# Altium PCB adau1979-fpga.PcbDoc (part 2 of 10)
Units mil, origin at the board's own origin, x right, y up, seen from the top; angles counter-clockwise.
Board outline 7874.02 x 9055.12 mil, 4 copper layers (Top Layer, GND, POWER, Bottom Layer), stack 23.756 mil thick; 636 components, 457 nets, 2015 pads, 4184 vias.
Unrouted connection lines stored in the file: 10.
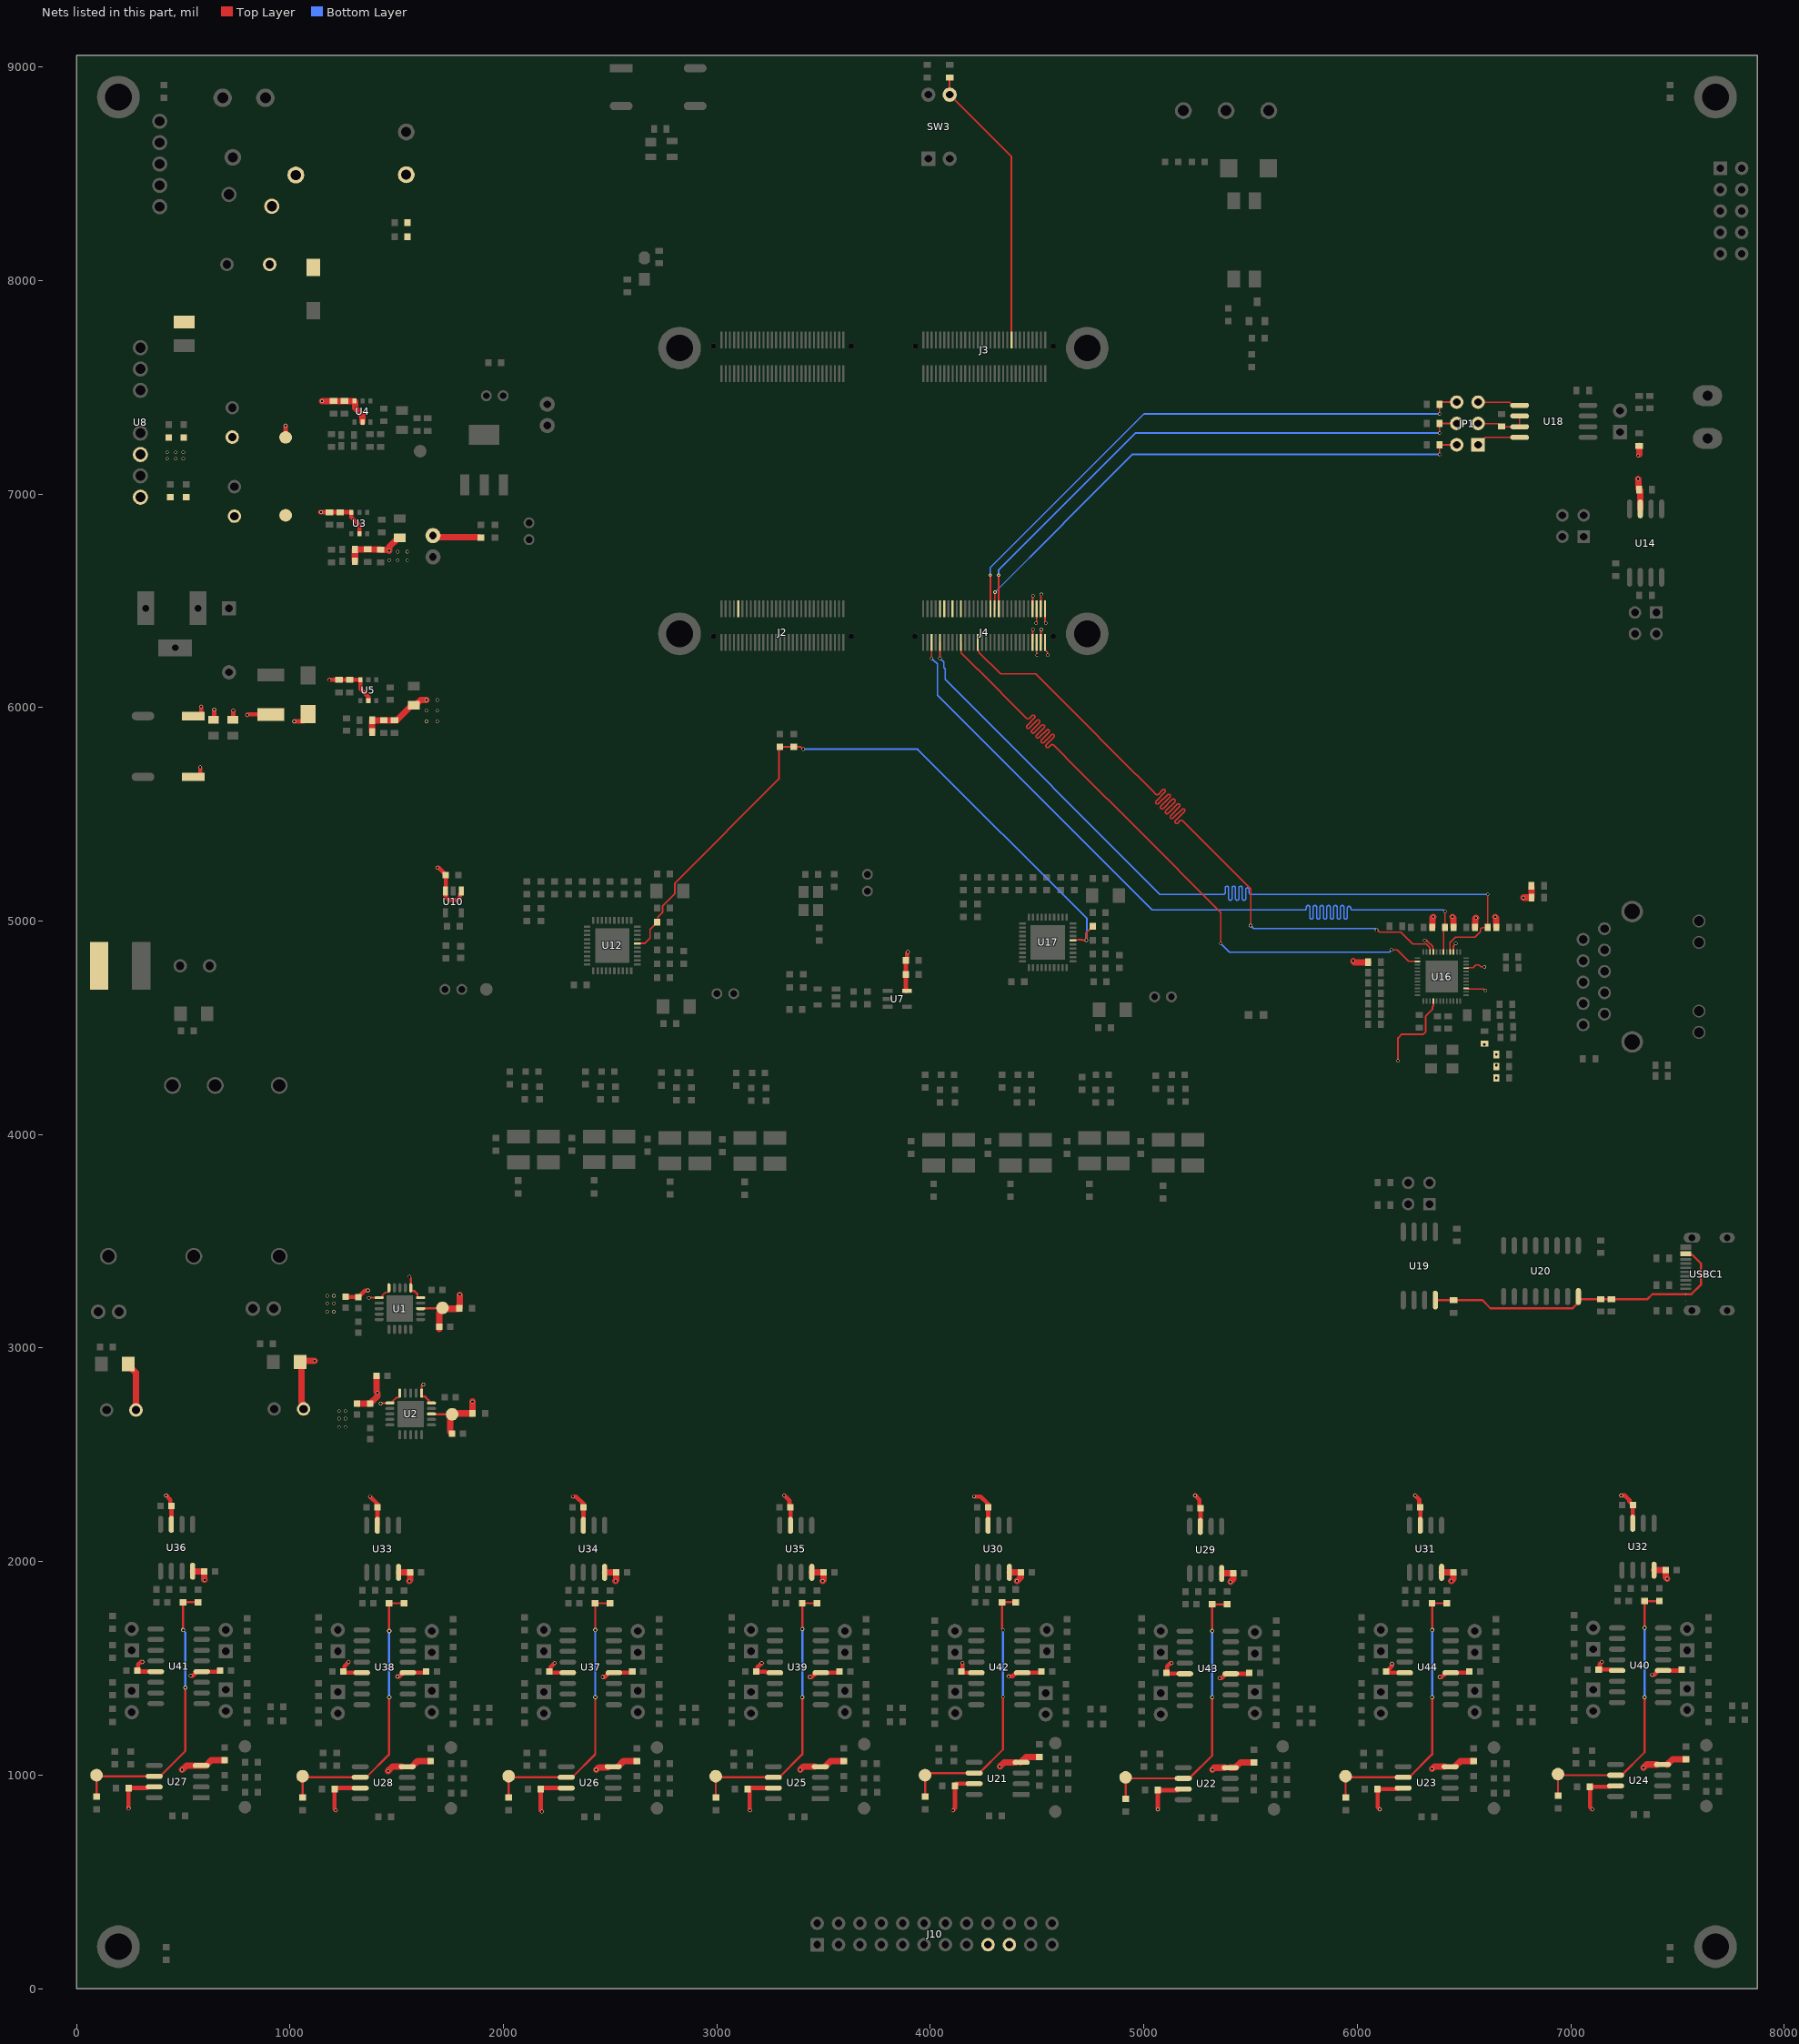
[diagram p4: the nets of this part, all layers, seen from the top]

## Footprints (in the part's own frame and the unit in brackets; to place one, negate y for a bottom-side part, rotate by r counter-clockwise, add the part's x,y. Pads: shape width x height; smd on the part's side, far side on the other; paste and mask are expansions set on the pad) (continued)
SOP-16 [mil] "淘宝ID:黄晶宝石"
  oval 80x24 smd: 1(0,0) 2(0,-50) 3(0,-100) 4(0,-150) 5(0,-200) 6(0,-250) 7(0,-300) 8(0,-350) 9(238.5,-350) 10(238.5,-300) 11(238.5,-250) 12(238.5,-200) 13(238.5,-150) 14(238.5,-100) 15(238.5,-50) 16(238.5,0)
  silkscreen extent 44,-375 194,25
SOT-23-5_L2.9-W1.6-P0.95-LS2.8-BL [mm]
  rect 0.6x1 smd paste+0 mask+0.05: 1(-0.95,-1.1) 2(0,-1.1) 3(0.95,-1.1) 4(0.95,1.1) 5(-0.95,1.1)
  silkscreen extent -1.52,-0.7 1.4,0.89
SOT-23-5_L3.0-W1.7-P0.95-LS2.8-BL [mm]
  rect 0.49x1.157 smd: 1(-0.95,-1.154) 2(0,-1.154) 3(0.95,-1.154)
  rect 0.49x1.175 smd: 4(0.95,1.154) 5(-0.95,1.154)
  silkscreen extent -1.8,-1.29 1.53,0.85
SOT-23-5_L3.0-W1.7-P0.95-LS2.8-BR [mil]
  rect 43.3x23.6 smd: 1(51.2,-37.4) 2(51.2,0) 3(51.2,37.4) 4(-51.1,37.4) 5(-51.1,-37.4)
  silkscreen extent -35,-61 36,61
SOT-23-6 [mm] "淘宝ID:黄晶宝石"
  rect 0.6x0.5 smd: 1(0,0) 2(0,-0.95) 3(0,-1.9) 4(2.5,-1.9) 5(2.5,-0.95) 6(2.5,0)
  silkscreen extent 0.63,-2.38 1.87,0.48
SOT-23_L2.9-W1.3-P1.90-LS2.4-BR [mm]
  rect 1x0.8 smd: 1(1.15,-0.95) 2(1.15,0.95) 3(-1.15,0)
  silkscreen extent -0.7,-1.5 0.7,1.5
SOT-143 [mil]
  rect 40x50 smd: 1(-32.5,-50)
  rect 30x50 smd: 2(37.5,-50) 3(37.5,50) 4(-37.5,50)
SOT-223-3_L6.5-W3.4-P2.30-LS7.0-BR [mm]
  rect 2.5x1.1 smd: 1(2.97,-2.3) 2(2.97,0) 3(2.97,2.3)
  rect 2.34x3.6 smd: 4(-2.97,0)
  silkscreen extent -1.57,-3.33 1.37,3.33
SW-TH_2MS1T2B2VS2QES [mm]
  round 1.8 hole 1.15: 1(0,-2.54) 2(0,0) 3(0,2.54) 4(0,5.08) 5(0,-5.08)
  silkscreen extent -2.54,-5.08 2.54,5.08
TEST [mm]
  round 1.5 smd: 1(0,0)
"TSW SMD-6*6*4.3" [mm] "6*6*4.3mm"
  rect 2.7x1 smd: 1(-4.4,2.261)
  oval 2.7x1 smd: 2(-4.4,-2.239) 3(4.4,-2.239) 4(4.4,2.261)
  silkscreen extent -2.79,-2.79 2.79,2.79, body extent -4.5,-3 4.5,3, height 4.25
USB-C_SMD-TYPE-C-31-M-12_1 [mm]
  oval 1.2x2 hole 0.8 slot 1.6 at 90 deg: 1(5.513,2.736) 4(-3.137,2.736)
  oval 1.2x1.8 hole 0.8 slot 1.4 at 90 deg: 2(5.513,-1.444) 3(-3.137,-1.444)
  round 0.12 smd: A1B12(-2.012,3.504) A4B9(-1.212,3.504)
  rect 0.3x1.3 smd paste-100 mask+0.051: A5(-0.062,3.504) A6(0.938,3.504) A7(1.438,3.504) A8(2.438,3.504) B5(2.938,3.504) B6(1.938,3.504) B7(0.438,3.504) B8(-0.562,3.504)
  rect 0.6x1.3 smd paste-100 mask+0.051: B1A12(4.388,3.504) B4A9(3.588,3.504)
  Top Layer region: -1.712,2.854 -2.012,2.854 -2.312,2.854 -2.312,4.154 -2.012,4.154 -1.712,4.154
  Top Layer region: -0.912,2.854 -1.212,2.854 -1.512,2.854 -1.512,4.154 -1.212,4.154 -0.912,4.154
  Keep-Out Layer board cut-out: 4.463,2.161 4.406,2.023 4.3,1.918 4.162,1.861 4.013,1.861 3.875,1.918 3.77,2.023 3.713,2.161 3.713,2.31 3.77,2.448 3.875,2.554 4.013,2.611 4.162,2.611 4.3,2.554 4.406,2.448 4.463,2.31
  Keep-Out Layer board cut-out: -1.337,2.161 -1.394,2.023 -1.5,1.918 -1.637,1.861 -1.787,1.861 -1.924,1.918 -2.03,2.023 -2.087,2.161 -2.087,2.31 -2.03,2.448 -1.924,2.554 -1.787,2.611 -1.637,2.611 -1.5,2.554 -1.394,2.448 -1.337,2.31
  Keep-Out Layer circle w0.025: c4.088,2.236 r0.375
  Keep-Out Layer circle w0.025: c-1.712,2.236 r0.375
  Keep-Out Layer region: 4.463,2.161 4.406,2.023 4.3,1.918 4.162,1.861 4.013,1.861 3.875,1.918 3.77,2.023 3.713,2.161 3.713,2.31 3.77,2.448 3.875,2.554 4.013,2.611 4.162,2.611 4.3,2.554 4.406,2.448 4.463,2.31
  Keep-Out Layer region: -1.337,2.161 -1.394,2.023 -1.5,1.918 -1.637,1.861 -1.787,1.861 -1.924,1.918 -2.03,2.023 -2.087,2.161 -2.087,2.31 -2.03,2.448 -1.924,2.554 -1.787,2.611 -1.637,2.611 -1.5,2.554 -1.394,2.448 -1.337,2.31
  silkscreen extent -3.28,-4.06 5.66,1.52

## Part data
1 2 3 4 5 6 7 8 9 10 11 12 13 14 15 16 17 18 19 20 21 22 23 24 +1 +2 -1 -2 -3 T1: library part TEST-POINT, "测试点"
C1 C2 C3 C4 C5 C6 C7 C8 C9 C10 C11 C12 C13 C16 C17 C18 C19 C20 C21 C22 C23 C24 C25 C26 C27 C28 C29 C75 C77 C84 C85 C86 C89 C91 C92 C93 C94 C102 C103 C104 C105 C106 C110 C111 C113 C116 C118 C127 C128 C129 C130 C132 C133 C140 C141 C142 C143 C144 C145 C146 C147 C148 C149 C150 C151 C152 C153 C154 C155 C156 C157 C158 C159 C160 C161 C162 C163 C164 C165 C166 C167 C168 C169 C170 C171 C172 C173 C174 C175 C176 C177 C178 C179 C180 C181 C182 C183 C184 C185 C186 C187 C188 C189 C190 C191 C192 C193 C194 C195 C196 C197 C198 C199 C200 C201 C202 C203 C204 C205 C206 C207 C208 C209 C210 C211: library part C, "贴片电容", BOM名称=无极性贴片电容, 唯一出售店铺网址=https://shop463601444.taobao.com, 淘宝ID="封装库来自淘宝 ID：黄晶宝石", 联系售后，技术支持=https://shop463601444.taobao.com
  C1 C2 C3 C4 C5 C6 C7: AddInBom=yes, DesignItemID=C, Device=C, FootprintName="C 0603_L", LibraryName="0.1 - 电阻-电容-电感", Origin Footprint="C 0201_L", OriginFootprint 2="C 0402_L", OriginFootprint 3="C 0805_L", OriginFootprint 4="C 1206_L", OriginFootprint 5="C 1210_L", OriginFootprint 6="C 1808_L", OriginFootprint 7="C 1812_L", OriginFootprint 8="C 1825_L", OriginFootprint 9="C 2225_L", OriginFootprint 10="C 0201_M", OriginFootprint 11="C 0402_M", OriginFootprint 12="C 0603_M", OriginFootprint 13="C 0805_M", OriginFootprint 14="C 1206_M", OriginFootprint 15="C 1210_M", OriginFootprint 16="C 1808_M", OriginFootprint 17="C 1812_M", OriginFootprint 18="C 1825_M", OriginFootprint 19="C 2225_M", OriginModelName="C 0603", Symbol=C
  C172: AddInBom=yes, DesignItemID=C, Device=C, FootprintName="C 0603_L", LibraryName="0.1 - 电阻-电容-电感", Origin Footprint="C 0201_L", OriginFootprint 2="C 0402_L", OriginFootprint 3="C 0805_L", OriginFootprint 4="C 1206_L", OriginFootprint 5="C 1210_L", OriginFootprint 6="C 1808_L", OriginFootprint 7="C 1812_L", OriginFootprint 8="C 1825_L", OriginFootprint 9="C 2225_L", OriginFootprint 10="C 0201_M", OriginFootprint 11="C 0402_M", OriginFootprint 12="C 0603_M", OriginFootprint 13="C 0805_M", OriginFootprint 14="C 1206_M", OriginFootprint 15="C 1210_M", OriginFootprint 16="C 1808_M", OriginFootprint 17="C 1812_M", OriginFootprint 18="C 1825_M", OriginFootprint 19="C 2225_M", OriginModelName="C 0603", SymbolName=C, UniqueId=2b2365c2d0e3ae99
  C173: AddInBom=yes, DesignItemID=C, Device=C, FootprintName="C 0603_L", LibraryName="0.1 - 电阻-电容-电感", Origin Footprint="C 0201_L", OriginFootprint 2="C 0402_L", OriginFootprint 3="C 0805_L", OriginFootprint 4="C 1206_L", OriginFootprint 5="C 1210_L", OriginFootprint 6="C 1808_L", OriginFootprint 7="C 1812_L", OriginFootprint 8="C 1825_L", OriginFootprint 9="C 2225_L", OriginFootprint 10="C 0201_M", OriginFootprint 11="C 0402_M", OriginFootprint 12="C 0603_M", OriginFootprint 13="C 0805_M", OriginFootprint 14="C 1206_M", OriginFootprint 15="C 1210_M", OriginFootprint 16="C 1808_M", OriginFootprint 17="C 1812_M", OriginFootprint 18="C 1825_M", OriginFootprint 19="C 2225_M", OriginModelName="C 0603", SymbolName=C, UniqueId=2ac4a713bdb27458
  C174: AddInBom=yes, DesignItemID=C, Device=C, FootprintName="C 0603_L", LibraryName="0.1 - 电阻-电容-电感", Origin Footprint="C 0201_L", OriginFootprint 2="C 0402_L", OriginFootprint 3="C 0805_L", OriginFootprint 4="C 1206_L", OriginFootprint 5="C 1210_L", OriginFootprint 6="C 1808_L", OriginFootprint 7="C 1812_L", OriginFootprint 8="C 1825_L", OriginFootprint 9="C 2225_L", OriginFootprint 10="C 0201_M", OriginFootprint 11="C 0402_M", OriginFootprint 12="C 0603_M", OriginFootprint 13="C 0805_M", OriginFootprint 14="C 1206_M", OriginFootprint 15="C 1210_M", OriginFootprint 16="C 1808_M", OriginFootprint 17="C 1812_M", OriginFootprint 18="C 1825_M", OriginFootprint 19="C 2225_M", OriginModelName="C 0603", SymbolName=C, UniqueId=043006a40a259ae3
  C175: AddInBom=yes, DesignItemID=C, Device=C, FootprintName="C 0603_L", LibraryName="0.1 - 电阻-电容-电感", Origin Footprint="C 0201_L", OriginFootprint 2="C 0402_L", OriginFootprint 3="C 0805_L", OriginFootprint 4="C 1206_L", OriginFootprint 5="C 1210_L", OriginFootprint 6="C 1808_L", OriginFootprint 7="C 1812_L", OriginFootprint 8="C 1825_L", OriginFootprint 9="C 2225_L", OriginFootprint 10="C 0201_M", OriginFootprint 11="C 0402_M", OriginFootprint 12="C 0603_M", OriginFootprint 13="C 0805_M", OriginFootprint 14="C 1206_M", OriginFootprint 15="C 1210_M", OriginFootprint 16="C 1808_M", OriginFootprint 17="C 1812_M", OriginFootprint 18="C 1825_M", OriginFootprint 19="C 2225_M", OriginModelName="C 0603", SymbolName=C, UniqueId=ed052c5890e059ff
  C176: AddInBom=yes, DesignItemID=C, Device=C, FootprintName="C 0603_L", LibraryName="0.1 - 电阻-电容-电感", Origin Footprint="C 0201_L", OriginFootprint 2="C 0402_L", OriginFootprint 3="C 0805_L", OriginFootprint 4="C 1206_L", OriginFootprint 5="C 1210_L", OriginFootprint 6="C 1808_L", OriginFootprint 7="C 1812_L", OriginFootprint 8="C 1825_L", OriginFootprint 9="C 2225_L", OriginFootprint 10="C 0201_M", OriginFootprint 11="C 0402_M", OriginFootprint 12="C 0603_M", OriginFootprint 13="C 0805_M", OriginFootprint 14="C 1206_M", OriginFootprint 15="C 1210_M", OriginFootprint 16="C 1808_M", OriginFootprint 17="C 1812_M", OriginFootprint 18="C 1825_M", OriginFootprint 19="C 2225_M", OriginModelName="C 0603", SymbolName=C, UniqueId=e3aeb17489c0ab5d
  C177: AddInBom=yes, DesignItemID=C, Device=C, FootprintName="C 0603_L", LibraryName="0.1 - 电阻-电容-电感", Origin Footprint="C 0201_L", OriginFootprint 2="C 0402_L", OriginFootprint 3="C 0805_L", OriginFootprint 4="C 1206_L", OriginFootprint 5="C 1210_L", OriginFootprint 6="C 1808_L", OriginFootprint 7="C 1812_L", OriginFootprint 8="C 1825_L", OriginFootprint 9="C 2225_L", OriginFootprint 10="C 0201_M", OriginFootprint 11="C 0402_M", OriginFootprint 12="C 0603_M", OriginFootprint 13="C 0805_M", OriginFootprint 14="C 1206_M", OriginFootprint 15="C 1210_M", OriginFootprint 16="C 1808_M", OriginFootprint 17="C 1812_M", OriginFootprint 18="C 1825_M", OriginFootprint 19="C 2225_M", OriginModelName="C 0603", SymbolName=C, UniqueId=cc1d00c51cc12124
  C178: AddInBom=yes, DesignItemID=C, Device=C, FootprintName="C 0603_L", LibraryName="0.1 - 电阻-电容-电感", Origin Footprint="C 0201_L", OriginFootprint 2="C 0402_L", OriginFootprint 3="C 0805_L", OriginFootprint 4="C 1206_L", OriginFootprint 5="C 1210_L", OriginFootprint 6="C 1808_L", OriginFootprint 7="C 1812_L", OriginFootprint 8="C 1825_L", OriginFootprint 9="C 2225_L", OriginFootprint 10="C 0201_M", OriginFootprint 11="C 0402_M", OriginFootprint 12="C 0603_M", OriginFootprint 13="C 0805_M", OriginFootprint 14="C 1206_M", OriginFootprint 15="C 1210_M", OriginFootprint 16="C 1808_M", OriginFootprint 17="C 1812_M", OriginFootprint 18="C 1825_M", OriginFootprint 19="C 2225_M", OriginModelName="C 0603", SymbolName=C, UniqueId=d2625f4b4bd439ef
  C179: AddInBom=yes, DesignItemID=C, Device=C, FootprintName="C 0603_L", LibraryName="0.1 - 电阻-电容-电感", Origin Footprint="C 0201_L", OriginFootprint 2="C 0402_L", OriginFootprint 3="C 0805_L", OriginFootprint 4="C 1206_L", OriginFootprint 5="C 1210_L", OriginFootprint 6="C 1808_L", OriginFootprint 7="C 1812_L", OriginFootprint 8="C 1825_L", OriginFootprint 9="C 2225_L", OriginFootprint 10="C 0201_M", OriginFootprint 11="C 0402_M", OriginFootprint 12="C 0603_M", OriginFootprint 13="C 0805_M", OriginFootprint 14="C 1206_M", OriginFootprint 15="C 1210_M", OriginFootprint 16="C 1808_M", OriginFootprint 17="C 1812_M", OriginFootprint 18="C 1825_M", OriginFootprint 19="C 2225_M", OriginModelName="C 0603", SymbolName=C, UniqueId=a26eb100929f0697
  C180: AddInBom=yes, DesignItemID=C, Device=C, FootprintName="C 0603_L", LibraryName="0.1 - 电阻-电容-电感", Origin Footprint="C 0201_L", OriginFootprint 2="C 0402_L", OriginFootprint 3="C 0805_L", OriginFootprint 4="C 1206_L", OriginFootprint 5="C 1210_L", OriginFootprint 6="C 1808_L", OriginFootprint 7="C 1812_L", OriginFootprint 8="C 1825_L", OriginFootprint 9="C 2225_L", OriginFootprint 10="C 0201_M", OriginFootprint 11="C 0402_M", OriginFootprint 12="C 0603_M", OriginFootprint 13="C 0805_M", OriginFootprint 14="C 1206_M", OriginFootprint 15="C 1210_M", OriginFootprint 16="C 1808_M", OriginFootprint 17="C 1812_M", OriginFootprint 18="C 1825_M", OriginFootprint 19="C 2225_M", OriginModelName="C 0603", SymbolName=C, UniqueId=6158349470ed1956
  C181: AddInBom=yes, DesignItemID=C, Device=C, FootprintName="C 0603_L", LibraryName="0.1 - 电阻-电容-电感", Origin Footprint="C 0201_L", OriginFootprint 2="C 0402_L", OriginFootprint 3="C 0805_L", OriginFootprint 4="C 1206_L", OriginFootprint 5="C 1210_L", OriginFootprint 6="C 1808_L", OriginFootprint 7="C 1812_L", OriginFootprint 8="C 1825_L", OriginFootprint 9="C 2225_L", OriginFootprint 10="C 0201_M", OriginFootprint 11="C 0402_M", OriginFootprint 12="C 0603_M", OriginFootprint 13="C 0805_M", OriginFootprint 14="C 1206_M", OriginFootprint 15="C 1210_M", OriginFootprint 16="C 1808_M", OriginFootprint 17="C 1812_M", OriginFootprint 18="C 1825_M", OriginFootprint 19="C 2225_M", OriginModelName="C 0603", SymbolName=C, UniqueId=de488198406d19e5
  C182: AddInBom=yes, DesignItemID=C, Device=C, FootprintName="C 0603_L", LibraryName="0.1 - 电阻-电容-电感", Origin Footprint="C 0201_L", OriginFootprint 2="C 0402_L", OriginFootprint 3="C 0805_L", OriginFootprint 4="C 1206_L", OriginFootprint 5="C 1210_L", OriginFootprint 6="C 1808_L", OriginFootprint 7="C 1812_L", OriginFootprint 8="C 1825_L", OriginFootprint 9="C 2225_L", OriginFootprint 10="C 0201_M", OriginFootprint 11="C 0402_M", OriginFootprint 12="C 0603_M", OriginFootprint 13="C 0805_M", OriginFootprint 14="C 1206_M", OriginFootprint 15="C 1210_M", OriginFootprint 16="C 1808_M", OriginFootprint 17="C 1812_M", OriginFootprint 18="C 1825_M", OriginFootprint 19="C 2225_M", OriginModelName="C 0603", SymbolName=C, UniqueId=ac7cf9eb5671d2c3
  C183: AddInBom=yes, DesignItemID=C, Device=C, FootprintName="C 0603_L", LibraryName="0.1 - 电阻-电容-电感", Origin Footprint="C 0201_L", OriginFootprint 2="C 0402_L", OriginFootprint 3="C 0805_L", OriginFootprint 4="C 1206_L", OriginFootprint 5="C 1210_L", OriginFootprint 6="C 1808_L", OriginFootprint 7="C 1812_L", OriginFootprint 8="C 1825_L", OriginFootprint 9="C 2225_L", OriginFootprint 10="C 0201_M", OriginFootprint 11="C 0402_M", OriginFootprint 12="C 0603_M", OriginFootprint 13="C 0805_M", OriginFootprint 14="C 1206_M", OriginFootprint 15="C 1210_M", OriginFootprint 16="C 1808_M", OriginFootprint 17="C 1812_M", OriginFootprint 18="C 1825_M", OriginFootprint 19="C 2225_M", OriginModelName="C 0603", SymbolName=C, UniqueId=5471cb5e6ead650e
  C184: AddInBom=yes, DesignItemID=C, Device=C, FootprintName="C 0603_L", LibraryName="0.1 - 电阻-电容-电感", Origin Footprint="C 0201_L", OriginFootprint 2="C 0402_L", OriginFootprint 3="C 0805_L", OriginFootprint 4="C 1206_L", OriginFootprint 5="C 1210_L", OriginFootprint 6="C 1808_L", OriginFootprint 7="C 1812_L", OriginFootprint 8="C 1825_L", OriginFootprint 9="C 2225_L", OriginFootprint 10="C 0201_M", OriginFootprint 11="C 0402_M", OriginFootprint 12="C 0603_M", OriginFootprint 13="C 0805_M", OriginFootprint 14="C 1206_M", OriginFootprint 15="C 1210_M", OriginFootprint 16="C 1808_M", OriginFootprint 17="C 1812_M", OriginFootprint 18="C 1825_M", OriginFootprint 19="C 2225_M", OriginModelName="C 0603", SymbolName=C, UniqueId=909660952e1a96fd
  C185: AddInBom=yes, DesignItemID=C, Device=C, FootprintName="C 0603_L", LibraryName="0.1 - 电阻-电容-电感", Origin Footprint="C 0201_L", OriginFootprint 2="C 0402_L", OriginFootprint 3="C 0805_L", OriginFootprint 4="C 1206_L", OriginFootprint 5="C 1210_L", OriginFootprint 6="C 1808_L", OriginFootprint 7="C 1812_L", OriginFootprint 8="C 1825_L", OriginFootprint 9="C 2225_L", OriginFootprint 10="C 0201_M", OriginFootprint 11="C 0402_M", OriginFootprint 12="C 0603_M", OriginFootprint 13="C 0805_M", OriginFootprint 14="C 1206_M", OriginFootprint 15="C 1210_M", OriginFootprint 16="C 1808_M", OriginFootprint 17="C 1812_M", OriginFootprint 18="C 1825_M", OriginFootprint 19="C 2225_M", OriginModelName="C 0603", SymbolName=C, UniqueId=7abe426619a81940
  C186: AddInBom=yes, DesignItemID=C, Device=C, FootprintName="C 0603_L", LibraryName="0.1 - 电阻-电容-电感", Origin Footprint="C 0201_L", OriginFootprint 2="C 0402_L", OriginFootprint 3="C 0805_L", OriginFootprint 4="C 1206_L", OriginFootprint 5="C 1210_L", OriginFootprint 6="C 1808_L", OriginFootprint 7="C 1812_L", OriginFootprint 8="C 1825_L", OriginFootprint 9="C 2225_L", OriginFootprint 10="C 0201_M", OriginFootprint 11="C 0402_M", OriginFootprint 12="C 0603_M", OriginFootprint 13="C 0805_M", OriginFootprint 14="C 1206_M", OriginFootprint 15="C 1210_M", OriginFootprint 16="C 1808_M", OriginFootprint 17="C 1812_M", OriginFootprint 18="C 1825_M", OriginFootprint 19="C 2225_M", OriginModelName="C 0603", SymbolName=C, UniqueId=f9bfd7a6531d354d
  C187: AddInBom=yes, DesignItemID=C, Device=C, FootprintName="C 0603_L", LibraryName="0.1 - 电阻-电容-电感", Origin Footprint="C 0201_L", OriginFootprint 2="C 0402_L", OriginFootprint 3="C 0805_L", OriginFootprint 4="C 1206_L", OriginFootprint 5="C 1210_L", OriginFootprint 6="C 1808_L", OriginFootprint 7="C 1812_L", OriginFootprint 8="C 1825_L", OriginFootprint 9="C 2225_L", OriginFootprint 10="C 0201_M", OriginFootprint 11="C 0402_M", OriginFootprint 12="C 0603_M", OriginFootprint 13="C 0805_M", OriginFootprint 14="C 1206_M", OriginFootprint 15="C 1210_M", OriginFootprint 16="C 1808_M", OriginFootprint 17="C 1812_M", OriginFootprint 18="C 1825_M", OriginFootprint 19="C 2225_M", OriginModelName="C 0603", SymbolName=C, UniqueId=ecf0d2211b923647
  C188: AddInBom=yes, DesignItemID=C, Device=C, FootprintName="C 0603_L", LibraryName="0.1 - 电阻-电容-电感", Origin Footprint="C 0201_L", OriginFootprint 2="C 0402_L", OriginFootprint 3="C 0805_L", OriginFootprint 4="C 1206_L", OriginFootprint 5="C 1210_L", OriginFootprint 6="C 1808_L", OriginFootprint 7="C 1812_L", OriginFootprint 8="C 1825_L", OriginFootprint 9="C 2225_L", OriginFootprint 10="C 0201_M", OriginFootprint 11="C 0402_M", OriginFootprint 12="C 0603_M", OriginFootprint 13="C 0805_M", OriginFootprint 14="C 1206_M", OriginFootprint 15="C 1210_M", OriginFootprint 16="C 1808_M", OriginFootprint 17="C 1812_M", OriginFootprint 18="C 1825_M", OriginFootprint 19="C 2225_M", OriginModelName="C 0603", SymbolName=C, UniqueId=a2ee6ceb65d30336
  C189: AddInBom=yes, DesignItemID=C, Device=C, FootprintName="C 0603_L", LibraryName="0.1 - 电阻-电容-电感", Origin Footprint="C 0201_L", OriginFootprint 2="C 0402_L", OriginFootprint 3="C 0805_L", OriginFootprint 4="C 1206_L", OriginFootprint 5="C 1210_L", OriginFootprint 6="C 1808_L", OriginFootprint 7="C 1812_L", OriginFootprint 8="C 1825_L", OriginFootprint 9="C 2225_L", OriginFootprint 10="C 0201_M", OriginFootprint 11="C 0402_M", OriginFootprint 12="C 0603_M", OriginFootprint 13="C 0805_M", OriginFootprint 14="C 1206_M", OriginFootprint 15="C 1210_M", OriginFootprint 16="C 1808_M", OriginFootprint 17="C 1812_M", OriginFootprint 18="C 1825_M", OriginFootprint 19="C 2225_M", OriginModelName="C 0603", SymbolName=C, UniqueId=ff078052695da6b6
  C190: AddInBom=yes, DesignItemID=C, Device=C, FootprintName="C 0603_L", LibraryName="0.1 - 电阻-电容-电感", Origin Footprint="C 0201_L", OriginFootprint 2="C 0402_L", OriginFootprint 3="C 0805_L", OriginFootprint 4="C 1206_L", OriginFootprint 5="C 1210_L", OriginFootprint 6="C 1808_L", OriginFootprint 7="C 1812_L", OriginFootprint 8="C 1825_L", OriginFootprint 9="C 2225_L", OriginFootprint 10="C 0201_M", OriginFootprint 11="C 0402_M", OriginFootprint 12="C 0603_M", OriginFootprint 13="C 0805_M", OriginFootprint 14="C 1206_M", OriginFootprint 15="C 1210_M", OriginFootprint 16="C 1808_M", OriginFootprint 17="C 1812_M", OriginFootprint 18="C 1825_M", OriginFootprint 19="C 2225_M", OriginModelName="C 0603", SymbolName=C, UniqueId=553def7d7947fca6
  C191: AddInBom=yes, DesignItemID=C, Device=C, FootprintName="C 0603_L", LibraryName="0.1 - 电阻-电容-电感", Origin Footprint="C 0201_L", OriginFootprint 2="C 0402_L", OriginFootprint 3="C 0805_L", OriginFootprint 4="C 1206_L", OriginFootprint 5="C 1210_L", OriginFootprint 6="C 1808_L", OriginFootprint 7="C 1812_L", OriginFootprint 8="C 1825_L", OriginFootprint 9="C 2225_L", OriginFootprint 10="C 0201_M", OriginFootprint 11="C 0402_M", OriginFootprint 12="C 0603_M", OriginFootprint 13="C 0805_M", OriginFootprint 14="C 1206_M", OriginFootprint 15="C 1210_M", OriginFootprint 16="C 1808_M", OriginFootprint 17="C 1812_M", OriginFootprint 18="C 1825_M", OriginFootprint 19="C 2225_M", OriginModelName="C 0603", SymbolName=C, UniqueId=54d3d224326b3f8f
  C192: AddInBom=yes, DesignItemID=C, Device=C, FootprintName="C 0603_L", LibraryName="0.1 - 电阻-电容-电感", Origin Footprint="C 0201_L", OriginFootprint 2="C 0402_L", OriginFootprint 3="C 0805_L", OriginFootprint 4="C 1206_L", OriginFootprint 5="C 1210_L", OriginFootprint 6="C 1808_L", OriginFootprint 7="C 1812_L", OriginFootprint 8="C 1825_L", OriginFootprint 9="C 2225_L", OriginFootprint 10="C 0201_M", OriginFootprint 11="C 0402_M", OriginFootprint 12="C 0603_M", OriginFootprint 13="C 0805_M", OriginFootprint 14="C 1206_M", OriginFootprint 15="C 1210_M", OriginFootprint 16="C 1808_M", OriginFootprint 17="C 1812_M", OriginFootprint 18="C 1825_M", OriginFootprint 19="C 2225_M", OriginModelName="C 0603", SymbolName=C, UniqueId=2b4e6e580c7acde0
  C193: AddInBom=yes, DesignItemID=C, Device=C, FootprintName="C 0603_L", LibraryName="0.1 - 电阻-电容-电感", Origin Footprint="C 0201_L", OriginFootprint 2="C 0402_L", OriginFootprint 3="C 0805_L", OriginFootprint 4="C 1206_L", OriginFootprint 5="C 1210_L", OriginFootprint 6="C 1808_L", OriginFootprint 7="C 1812_L", OriginFootprint 8="C 1825_L", OriginFootprint 9="C 2225_L", OriginFootprint 10="C 0201_M", OriginFootprint 11="C 0402_M", OriginFootprint 12="C 0603_M", OriginFootprint 13="C 0805_M", OriginFootprint 14="C 1206_M", OriginFootprint 15="C 1210_M", OriginFootprint 16="C 1808_M", OriginFootprint 17="C 1812_M", OriginFootprint 18="C 1825_M", OriginFootprint 19="C 2225_M", OriginModelName="C 0603", SymbolName=C, UniqueId=12af2948e5a85261
  C194: AddInBom=yes, DesignItemID=C, Device=C, FootprintName="C 0603_L", LibraryName="0.1 - 电阻-电容-电感", Origin Footprint="C 0201_L", OriginFootprint 2="C 0402_L", OriginFootprint 3="C 0805_L", OriginFootprint 4="C 1206_L", OriginFootprint 5="C 1210_L", OriginFootprint 6="C 1808_L", OriginFootprint 7="C 1812_L", OriginFootprint 8="C 1825_L", OriginFootprint 9="C 2225_L", OriginFootprint 10="C 0201_M", OriginFootprint 11="C 0402_M", OriginFootprint 12="C 0603_M", OriginFootprint 13="C 0805_M", OriginFootprint 14="C 1206_M", OriginFootprint 15="C 1210_M", OriginFootprint 16="C 1808_M", OriginFootprint 17="C 1812_M", OriginFootprint 18="C 1825_M", OriginFootprint 19="C 2225_M", OriginModelName="C 0603", SymbolName=C, UniqueId=5bfcee5f0e3d202c
  C195: AddInBom=yes, DesignItemID=C, Device=C, FootprintName="C 0603_L", LibraryName="0.1 - 电阻-电容-电感", Origin Footprint="C 0201_L", OriginFootprint 2="C 0402_L", OriginFootprint 3="C 0805_L", OriginFootprint 4="C 1206_L", OriginFootprint 5="C 1210_L", OriginFootprint 6="C 1808_L", OriginFootprint 7="C 1812_L", OriginFootprint 8="C 1825_L", OriginFootprint 9="C 2225_L", OriginFootprint 10="C 0201_M", OriginFootprint 11="C 0402_M", OriginFootprint 12="C 0603_M", OriginFootprint 13="C 0805_M", OriginFootprint 14="C 1206_M", OriginFootprint 15="C 1210_M", OriginFootprint 16="C 1808_M", OriginFootprint 17="C 1812_M", OriginFootprint 18="C 1825_M", OriginFootprint 19="C 2225_M", OriginModelName="C 0603", SymbolName=C, UniqueId=3db1f6a400993974
  C196: AddInBom=yes, DesignItemID=C, Device=C, FootprintName="C 0603_L", LibraryName="0.1 - 电阻-电容-电感", Origin Footprint="C 0201_L", OriginFootprint 2="C 0402_L", OriginFootprint 3="C 0805_L", OriginFootprint 4="C 1206_L", OriginFootprint 5="C 1210_L", OriginFootprint 6="C 1808_L", OriginFootprint 7="C 1812_L", OriginFootprint 8="C 1825_L", OriginFootprint 9="C 2225_L", OriginFootprint 10="C 0201_M", OriginFootprint 11="C 0402_M", OriginFootprint 12="C 0603_M", OriginFootprint 13="C 0805_M", OriginFootprint 14="C 1206_M", OriginFootprint 15="C 1210_M", OriginFootprint 16="C 1808_M", OriginFootprint 17="C 1812_M", OriginFootprint 18="C 1825_M", OriginFootprint 19="C 2225_M", OriginModelName="C 0603", SymbolName=C, UniqueId=e068690e94c157bc
  C197: AddInBom=yes, DesignItemID=C, Device=C, FootprintName="C 0603_L", LibraryName="0.1 - 电阻-电容-电感", Origin Footprint="C 0201_L", OriginFootprint 2="C 0402_L", OriginFootprint 3="C 0805_L", OriginFootprint 4="C 1206_L", OriginFootprint 5="C 1210_L", OriginFootprint 6="C 1808_L", OriginFootprint 7="C 1812_L", OriginFootprint 8="C 1825_L", OriginFootprint 9="C 2225_L", OriginFootprint 10="C 0201_M", OriginFootprint 11="C 0402_M", OriginFootprint 12="C 0603_M", OriginFootprint 13="C 0805_M", OriginFootprint 14="C 1206_M", OriginFootprint 15="C 1210_M", OriginFootprint 16="C 1808_M", OriginFootprint 17="C 1812_M", OriginFootprint 18="C 1825_M", OriginFootprint 19="C 2225_M", OriginModelName="C 0603", SymbolName=C, UniqueId=60b913fe2234996d
  C198: AddInBom=yes, DesignItemID=C, Device=C, FootprintName="C 0603_L", LibraryName="0.1 - 电阻-电容-电感", Origin Footprint="C 0201_L", OriginFootprint 2="C 0402_L", OriginFootprint 3="C 0805_L", OriginFootprint 4="C 1206_L", OriginFootprint 5="C 1210_L", OriginFootprint 6="C 1808_L", OriginFootprint 7="C 1812_L", OriginFootprint 8="C 1825_L", OriginFootprint 9="C 2225_L", OriginFootprint 10="C 0201_M", OriginFootprint 11="C 0402_M", OriginFootprint 12="C 0603_M", OriginFootprint 13="C 0805_M", OriginFootprint 14="C 1206_M", OriginFootprint 15="C 1210_M", OriginFootprint 16="C 1808_M", OriginFootprint 17="C 1812_M", OriginFootprint 18="C 1825_M", OriginFootprint 19="C 2225_M", OriginModelName="C 0603", SymbolName=C, UniqueId=5298304991856aac
  C199: AddInBom=yes, DesignItemID=C, Device=C, FootprintName="C 0603_L", LibraryName="0.1 - 电阻-电容-电感", Origin Footprint="C 0201_L", OriginFootprint 2="C 0402_L", OriginFootprint 3="C 0805_L", OriginFootprint 4="C 1206_L", OriginFootprint 5="C 1210_L", OriginFootprint 6="C 1808_L", OriginFootprint 7="C 1812_L", OriginFootprint 8="C 1825_L", OriginFootprint 9="C 2225_L", OriginFootprint 10="C 0201_M", OriginFootprint 11="C 0402_M", OriginFootprint 12="C 0603_M", OriginFootprint 13="C 0805_M", OriginFootprint 14="C 1206_M", OriginFootprint 15="C 1210_M", OriginFootprint 16="C 1808_M", OriginFootprint 17="C 1812_M", OriginFootprint 18="C 1825_M", OriginFootprint 19="C 2225_M", OriginModelName="C 0603", SymbolName=C, UniqueId=cd91d26fa4917fbf
  C200: AddInBom=yes, DesignItemID=C, Device=C, FootprintName="C 0603_L", LibraryName="0.1 - 电阻-电容-电感", Origin Footprint="C 0201_L", OriginFootprint 2="C 0402_L", OriginFootprint 3="C 0805_L", OriginFootprint 4="C 1206_L", OriginFootprint 5="C 1210_L", OriginFootprint 6="C 1808_L", OriginFootprint 7="C 1812_L", OriginFootprint 8="C 1825_L", OriginFootprint 9="C 2225_L", OriginFootprint 10="C 0201_M", OriginFootprint 11="C 0402_M", OriginFootprint 12="C 0603_M", OriginFootprint 13="C 0805_M", OriginFootprint 14="C 1206_M", OriginFootprint 15="C 1210_M", OriginFootprint 16="C 1808_M", OriginFootprint 17="C 1812_M", OriginFootprint 18="C 1825_M", OriginFootprint 19="C 2225_M", OriginModelName="C 0603", SymbolName=C, UniqueId=485846f0059d8f41
  C201: AddInBom=yes, DesignItemID=C, Device=C, FootprintName="C 0603_L", LibraryName="0.1 - 电阻-电容-电感", Origin Footprint="C 0201_L", OriginFootprint 2="C 0402_L", OriginFootprint 3="C 0805_L", OriginFootprint 4="C 1206_L", OriginFootprint 5="C 1210_L", OriginFootprint 6="C 1808_L", OriginFootprint 7="C 1812_L", OriginFootprint 8="C 1825_L", OriginFootprint 9="C 2225_L", OriginFootprint 10="C 0201_M", OriginFootprint 11="C 0402_M", OriginFootprint 12="C 0603_M", OriginFootprint 13="C 0805_M", OriginFootprint 14="C 1206_M", OriginFootprint 15="C 1210_M", OriginFootprint 16="C 1808_M", OriginFootprint 17="C 1812_M", OriginFootprint 18="C 1825_M", OriginFootprint 19="C 2225_M", OriginModelName="C 0603", SymbolName=C, UniqueId=7c578440d25b8116
  C202: AddInBom=yes, DesignItemID=C, Device=C, FootprintName="C 0603_L", LibraryName="0.1 - 电阻-电容-电感", Origin Footprint="C 0201_L", OriginFootprint 2="C 0402_L", OriginFootprint 3="C 0805_L", OriginFootprint 4="C 1206_L", OriginFootprint 5="C 1210_L", OriginFootprint 6="C 1808_L", OriginFootprint 7="C 1812_L", OriginFootprint 8="C 1825_L", OriginFootprint 9="C 2225_L", OriginFootprint 10="C 0201_M", OriginFootprint 11="C 0402_M", OriginFootprint 12="C 0603_M", OriginFootprint 13="C 0805_M", OriginFootprint 14="C 1206_M", OriginFootprint 15="C 1210_M", OriginFootprint 16="C 1808_M", OriginFootprint 17="C 1812_M", OriginFootprint 18="C 1825_M", OriginFootprint 19="C 2225_M", OriginModelName="C 0603", SymbolName=C, UniqueId=09d5d64189419707
  C203: AddInBom=yes, DesignItemID=C, Device=C, FootprintName="C 0603_L", LibraryName="0.1 - 电阻-电容-电感", Origin Footprint="C 0201_L", OriginFootprint 2="C 0402_L", OriginFootprint 3="C 0805_L", OriginFootprint 4="C 1206_L", OriginFootprint 5="C 1210_L", OriginFootprint 6="C 1808_L", OriginFootprint 7="C 1812_L", OriginFootprint 8="C 1825_L", OriginFootprint 9="C 2225_L", OriginFootprint 10="C 0201_M", OriginFootprint 11="C 0402_M", OriginFootprint 12="C 0603_M", OriginFootprint 13="C 0805_M", OriginFootprint 14="C 1206_M", OriginFootprint 15="C 1210_M", OriginFootprint 16="C 1808_M", OriginFootprint 17="C 1812_M", OriginFootprint 18="C 1825_M", OriginFootprint 19="C 2225_M", OriginModelName="C 0603", SymbolName=C, UniqueId=a4fa6dbd8546cc48
  C204: AddInBom=yes, DesignItemID=C, Device=C, FootprintName="C 0603_L", LibraryName="0.1 - 电阻-电容-电感", Origin Footprint="C 0201_L", OriginFootprint 2="C 0402_L", OriginFootprint 3="C 0805_L", OriginFootprint 4="C 1206_L", OriginFootprint 5="C 1210_L", OriginFootprint 6="C 1808_L", OriginFootprint 7="C 1812_L", OriginFootprint 8="C 1825_L", OriginFootprint 9="C 2225_L", OriginFootprint 10="C 0201_M", OriginFootprint 11="C 0402_M", OriginFootprint 12="C 0603_M", OriginFootprint 13="C 0805_M", OriginFootprint 14="C 1206_M", OriginFootprint 15="C 1210_M", OriginFootprint 16="C 1808_M", OriginFootprint 17="C 1812_M", OriginFootprint 18="C 1825_M", OriginFootprint 19="C 2225_M", OriginModelName="C 0603", SymbolName=C, UniqueId=cc82bf2c2e22e605
  C205: AddInBom=yes, DesignItemID=C, Device=C, FootprintName="C 0603_L", LibraryName="0.1 - 电阻-电容-电感", Origin Footprint="C 0201_L", OriginFootprint 2="C 0402_L", OriginFootprint 3="C 0805_L", OriginFootprint 4="C 1206_L", OriginFootprint 5="C 1210_L", OriginFootprint 6="C 1808_L", OriginFootprint 7="C 1812_L", OriginFootprint 8="C 1825_L", OriginFootprint 9="C 2225_L", OriginFootprint 10="C 0201_M", OriginFootprint 11="C 0402_M", OriginFootprint 12="C 0603_M", OriginFootprint 13="C 0805_M", OriginFootprint 14="C 1206_M", OriginFootprint 15="C 1210_M", OriginFootprint 16="C 1808_M", OriginFootprint 17="C 1812_M", OriginFootprint 18="C 1825_M", OriginFootprint 19="C 2225_M", OriginModelName="C 0603", SymbolName=C, UniqueId=ab4a8fe24fad9fe4
  C206: AddInBom=yes, DesignItemID=C, Device=C, FootprintName="C 0603_L", LibraryName="0.1 - 电阻-电容-电感", Origin Footprint="C 0201_L", OriginFootprint 2="C 0402_L", OriginFootprint 3="C 0805_L", OriginFootprint 4="C 1206_L", OriginFootprint 5="C 1210_L", OriginFootprint 6="C 1808_L", OriginFootprint 7="C 1812_L", OriginFootprint 8="C 1825_L", OriginFootprint 9="C 2225_L", OriginFootprint 10="C 0201_M", OriginFootprint 11="C 0402_M", OriginFootprint 12="C 0603_M", OriginFootprint 13="C 0805_M", OriginFootprint 14="C 1206_M", OriginFootprint 15="C 1210_M", OriginFootprint 16="C 1808_M", OriginFootprint 17="C 1812_M", OriginFootprint 18="C 1825_M", OriginFootprint 19="C 2225_M", OriginModelName="C 0603", SymbolName=C, UniqueId=deb55bbe20a101cf
  C207: AddInBom=yes, DesignItemID=C, Device=C, FootprintName="C 0603_L", LibraryName="0.1 - 电阻-电容-电感", Origin Footprint="C 0201_L", OriginFootprint 2="C 0402_L", OriginFootprint 3="C 0805_L", OriginFootprint 4="C 1206_L", OriginFootprint 5="C 1210_L", OriginFootprint 6="C 1808_L", OriginFootprint 7="C 1812_L", OriginFootprint 8="C 1825_L", OriginFootprint 9="C 2225_L", OriginFootprint 10="C 0201_M", OriginFootprint 11="C 0402_M", OriginFootprint 12="C 0603_M", OriginFootprint 13="C 0805_M", OriginFootprint 14="C 1206_M", OriginFootprint 15="C 1210_M", OriginFootprint 16="C 1808_M", OriginFootprint 17="C 1812_M", OriginFootprint 18="C 1825_M", OriginFootprint 19="C 2225_M", OriginModelName="C 0603", SymbolName=C, UniqueId=6827ca7a6bd67e26
  C208: AddInBom=yes, DesignItemID=C, Device=C, FootprintName="C 0603_L", LibraryName="0.1 - 电阻-电容-电感", Origin Footprint="C 0201_L", OriginFootprint 2="C 0402_L", OriginFootprint 3="C 0805_L", OriginFootprint 4="C 1206_L", OriginFootprint 5="C 1210_L", OriginFootprint 6="C 1808_L", OriginFootprint 7="C 1812_L", OriginFootprint 8="C 1825_L", OriginFootprint 9="C 2225_L", OriginFootprint 10="C 0201_M", OriginFootprint 11="C 0402_M", OriginFootprint 12="C 0603_M", OriginFootprint 13="C 0805_M", OriginFootprint 14="C 1206_M", OriginFootprint 15="C 1210_M", OriginFootprint 16="C 1808_M", OriginFootprint 17="C 1812_M", OriginFootprint 18="C 1825_M", OriginFootprint 19="C 2225_M", OriginModelName="C 0603", SymbolName=C, UniqueId=9b91e7356bb9865f
  C209: AddInBom=yes, DesignItemID=C, Device=C, FootprintName="C 0603_L", LibraryName="0.1 - 电阻-电容-电感", Origin Footprint="C 0201_L", OriginFootprint 2="C 0402_L", OriginFootprint 3="C 0805_L", OriginFootprint 4="C 1206_L", OriginFootprint 5="C 1210_L", OriginFootprint 6="C 1808_L", OriginFootprint 7="C 1812_L", OriginFootprint 8="C 1825_L", OriginFootprint 9="C 2225_L", OriginFootprint 10="C 0201_M", OriginFootprint 11="C 0402_M", OriginFootprint 12="C 0603_M", OriginFootprint 13="C 0805_M", OriginFootprint 14="C 1206_M", OriginFootprint 15="C 1210_M", OriginFootprint 16="C 1808_M", OriginFootprint 17="C 1812_M", OriginFootprint 18="C 1825_M", OriginFootprint 19="C 2225_M", OriginModelName="C 0603", SymbolName=C, UniqueId=4b556904310d1556
  C210: AddInBom=yes, DesignItemID=C, Device=C, FootprintName="C 0603_L", LibraryName="0.1 - 电阻-电容-电感", Origin Footprint="C 0201_L", OriginFootprint 2="C 0402_L", OriginFootprint 3="C 0805_L", OriginFootprint 4="C 1206_L", OriginFootprint 5="C 1210_L", OriginFootprint 6="C 1808_L", OriginFootprint 7="C 1812_L", OriginFootprint 8="C 1825_L", OriginFootprint 9="C 2225_L", OriginFootprint 10="C 0201_M", OriginFootprint 11="C 0402_M", OriginFootprint 12="C 0603_M", OriginFootprint 13="C 0805_M", OriginFootprint 14="C 1206_M", OriginFootprint 15="C 1210_M", OriginFootprint 16="C 1808_M", OriginFootprint 17="C 1812_M", OriginFootprint 18="C 1825_M", OriginFootprint 19="C 2225_M", OriginModelName="C 0603", SymbolName=C, UniqueId=af7046427a4bfdfb
  C211: AddInBom=yes, DesignItemID=C, Device=C, FootprintName="C 0603_L", LibraryName="0.1 - 电阻-电容-电感", Origin Footprint="C 0201_L", OriginFootprint 2="C 0402_L", OriginFootprint 3="C 0805_L", OriginFootprint 4="C 1206_L", OriginFootprint 5="C 1210_L", OriginFootprint 6="C 1808_L", OriginFootprint 7="C 1812_L", OriginFootprint 8="C 1825_L", OriginFootprint 9="C 2225_L", OriginFootprint 10="C 0201_M", OriginFootprint 11="C 0402_M", OriginFootprint 12="C 0603_M", OriginFootprint 13="C 0805_M", OriginFootprint 14="C 1206_M", OriginFootprint 15="C 1210_M", OriginFootprint 16="C 1808_M", OriginFootprint 17="C 1812_M", OriginFootprint 18="C 1825_M", OriginFootprint 19="C 2225_M", OriginModelName="C 0603", SymbolName=C, UniqueId=65328433fb04ddb7
C14 C15: library part CE_SMD, "贴片电解电容", BOM名称=贴片电解电容, 版权归属="封装库来自淘宝 ID：黄晶宝石", 联系售后=https://shop463601444.taobao.com
C30 C31 C32 C33 C34 C35 C36 C37 C38 C39 C41 C42 C45 C46 C48 C50 C53 C59 C61 C62 C66 C67 C68 C71 C74 C78 C80 C81 C87 C90 C95 C98 C99 C100 C108 C112 C115 C119 C120 C123 C125 C126 C134 C136 C138 C139: library part C, "无极性贴片电容", BOM名称=无极性贴片电容, 学习资源=www.ooocke.com, 版权归属=源创客
C40 C52 C88 C131: library part CAP_2
C43 C44 C47 C49 C54 C56: library part CAP
C51 C58 C64 C73 C76 C79 C83 C97 C101 C107 C109 C114 C117 C122 C124 C137: library part fs32x106k101egg, "容值:10uF;精度:±10%;额定电压:100V;温度系数:X7R;", JLCPCB Part Class="Extended Part", LCSC Part Name="10uF ±10% 100V", Manufacturer=PSA(信昌电陶), ManufacturerPart=FS32X106K101EGG, Temperature Coefficient=X7R, Tolerance=±10%, Voltage Rating=100V, AddInBom=yes, ConvertToPcb=yes, Datasheet=https://item.szlcsc.com/datasheet/FS32X106K101EGG/5791227.html, FootprintName=C1210, ModelId=833068e7fe044595a6eec77c56179455, ModelName=C1210_L3.2-W2.5-H2.5, ModelTransform=125.984,98.425,0,0,0,0,0,0,0, Supplier=LCSC, Supplier Footprint=1210, SupplierPart=C5156756, Symbol=FS32X106K101EGG
C55 C57: library part Cap, "Capacitor", LatestRevisionDate=17-Jul-2002, LatestRevisionNote="Re-released for DXP Platform.", Published=8-Jun-2000, Publisher="Altium Limited"
C60 C65: library part 100yxj10m6.3x11, "容值:10uF;精度:±20%;额定电压:100V;纹波电流:112.14mA@120Hz;等效串联电阻(ESR):570mΩ;", Equivalent Series Resistance(ESR)=570mΩ, JLCPCB Part Class="Extended Part", LCSC Part Name="10uF ±20% 100V", Manufacturer=Rubycon(红宝石), ManufacturerPart=100YXJ10M6.3X11, Operating Temperature=-40℃~+105℃, Ripple Current=112.14mA@120Hz, Tolerance=±20%, Voltage Rating=100V, AddInBom=yes, ConvertToPcb=yes, Diameter=6.3mm, FootprintName=CAP-TH_BD6.3-P2.50-D0.6-FD, Height - Seated (Max)=11mm, Lifetime=7000hrs@105℃, ModelId=3cdd55eab6a840dba93006d5a727d063, ModelName=CAP-TH_BD6.3-P2.50-D0.6-FD, ModelTransform=247.778,247.90446,0,0,0,0,0,0,-137.795, Pin Spacing=2.5mm, Supplier=LCSC, Supplier Footprint=插件,D6.3xL11mm, SupplierPart=C1668981, Symbol=100YXJ10M6.3X11
C63 C69 C70: library part eeufr1h101, "容值:100uF;精度:±20%;额定电压:50V;纹波电流:870mA@100kHz;等效串联电阻(ESR):61mΩ@100kHz;", Equivalent Series Resistance(ESR)=61mΩ@100kHz, JLCPCB Part Class="Extended Part", LCSC Part Name="100uF ±20% 50V", Manufacturer=PANASONIC(松下), ManufacturerPart=EEUFR1H101, Operating Temperature=-40℃~+105℃, Ripple Current=870mA@100kHz, Tolerance=±20%, Voltage Rating=50V, AddInBom=yes, ConvertToPcb=yes, Datasheet=https://item.szlcsc.com/datasheet/EEUFR1H101/190095.html, Diameter=8mm, FootprintName=CAP-TH_BD8.0-P3.50-D0.6-FD_1, Height - Seated (Max)=11.5mm, Lifetime=6000hrs@105℃, ModelId=5fc21599cab34df2ad7753b19b2f5286, ModelName=CAP-TH_BD8.0-P3.50-D0.6-FD_1, ModelTransform=315.365,314.914,0,0,0,0,0,0,-196.85, Pin Spacing=3.5mm, Polarity type=有极性, Supplier=LCSC, Supplier Footprint=插件,D8xL11.5mm, SupplierPart=C178702, Symbol=EEUFR1H101
C72: library part cl31b475kbhnnne, "容值:4.7uF;精度:±10%;额定电压:50V;温度系数:X7R;", JLCPCB Part Class="Extended Part", LCSC Part Name="4.7uF ±10% 50V", Manufacturer=SAMSUNG(三星), ManufacturerPart=CL31B475KBHNNNE, Temperature Coefficient=X7R, Tolerance=±10%, Voltage Rating=50V, AddInBom=yes, ConvertToPcb=yes, Datasheet=https://item.szlcsc.com/datasheet/CL31B475KBHNNNE/52218.html, FootprintName=C1206, ModelId=e4be705b945545a48e666415e3682bd8, ModelName=C1206_L3.2-W1.6-H1.3, ModelTransform=125.984,62.992,0,0,0,0,0,0,0, Supplier=LCSC, Supplier Footprint=1206, SupplierPart=C51205, Symbol=CL31B475KBHNNNE
C82 C96 C121 C135: library part cl31b106kahnnne, "容值:10uF;精度:±10%;额定电压:25V;温度系数:X7R;", JLCPCB Part Class="Extended Part", LCSC Part Name="10uF ±10% 25V", Manufacturer=SAMSUNG(三星), ManufacturerPart=CL31B106KAHNNNE, Temperature Coefficient=X7R, Tolerance=±10%, Voltage Rating=25V, AddInBom=yes, ConvertToPcb=yes, Datasheet=https://item.szlcsc.com/datasheet/CL31B106KAHNNNE/15532.html, FootprintName=C1206, ModelId=e4be705b945545a48e666415e3682bd8, ModelName=C1206_L3.2-W1.6-H1.3, ModelTransform=125.984,62.992,0,0,0,0,0,0,0, Supplier=LCSC, Supplier Footprint=1206, SupplierPart=C14860, Symbol=CL31B106KAHNNNE
CON1 J6 J7 JP2 JP3 JP4 JP5 JP6 JP7 JP8 JP9 JP10 JP11 JP12 JP13 JP14 JP15 JP16 JP17 JP18 JP19 JP20 JP21 JP22 JP23 JP24 JP25 JP26 JP27 JP28 JP29 JP30 JP31 JP32 JP33: library part "Header 2", "2P接插件", BOM名称=2P接插件
  CON1: 学习资源=https://shop463601444.taobao.com, 版权归属="封装库来自淘宝卖家 ID：黄晶宝石"
  J6 J7: 技术支持，联系售后="封装库来自淘宝卖家 ID：黄晶宝石", 版权归属="封装库来自淘宝 ID：黄晶宝石", 联系售后=https://shop463601444.taobao.com
  JP2: AddInBom=yes, DesignItemID="Header 2", Device="Header 2", FootprintName=HDR2.54-LI-2P, LibraryName="5.4 - 接插件-脚距2.54 (100mil)", Origin Footprint=XH2.54-WI-2P, OriginFootprint 2=XH2.54-LI-2P, OriginFootprint 3=HDR2.54-M-LI-2P, OriginFootprint 4=HDR2.54-WI-2P, OriginFootprint 5=HDR2.54-WS-2P, OriginFootprint 6=HDR2.54-Y-LI-2P, OriginFootprint 7=HDR2.54-M-WS-2P, OriginFootprint 8=KF2510-LI-2P, OriginFootprint 9=XH2.54-WS-2P, OriginFootprint 10=XH2.54-LS-2P, OriginFootprint 11=KF2EDGK-2.54-LI-2P, OriginFootprint 12=KF2EDGK-2.54-WI-2P, OriginModelName=HDR2.54-1P, SymbolName="Header 2", UniqueId=307b99641c701ee0, 版权归属="封装库来自淘宝 ID：黄晶宝石", 联系售后=https://shop463601444.taobao.com
  JP3: AddInBom=yes, DesignItemID="Header 2", Device="Header 2", FootprintName=HDR2.54-LI-2P, LibraryName="5.4 - 接插件-脚距2.54 (100mil)", Origin Footprint=XH2.54-WI-2P, OriginFootprint 2=XH2.54-LI-2P, OriginFootprint 3=HDR2.54-M-LI-2P, OriginFootprint 4=HDR2.54-WI-2P, OriginFootprint 5=HDR2.54-WS-2P, OriginFootprint 6=HDR2.54-Y-LI-2P, OriginFootprint 7=HDR2.54-M-WS-2P, OriginFootprint 8=KF2510-LI-2P, OriginFootprint 9=XH2.54-WS-2P, OriginFootprint 10=XH2.54-LS-2P, OriginFootprint 11=KF2EDGK-2.54-LI-2P, OriginFootprint 12=KF2EDGK-2.54-WI-2P, OriginModelName=HDR2.54-1P, SymbolName="Header 2", UniqueId=62dfc6d8d4781687, 版权归属="封装库来自淘宝 ID：黄晶宝石", 联系售后=https://shop463601444.taobao.com
  JP4: AddInBom=yes, DesignItemID="Header 2", Device="Header 2", FootprintName=HDR2.54-LI-2P, LibraryName="5.4 - 接插件-脚距2.54 (100mil)", Origin Footprint=XH2.54-WI-2P, OriginFootprint 2=XH2.54-LI-2P, OriginFootprint 3=HDR2.54-M-LI-2P, OriginFootprint 4=HDR2.54-WI-2P, OriginFootprint 5=HDR2.54-WS-2P, OriginFootprint 6=HDR2.54-Y-LI-2P, OriginFootprint 7=HDR2.54-M-WS-2P, OriginFootprint 8=KF2510-LI-2P, OriginFootprint 9=XH2.54-WS-2P, OriginFootprint 10=XH2.54-LS-2P, OriginFootprint 11=KF2EDGK-2.54-LI-2P, OriginFootprint 12=KF2EDGK-2.54-WI-2P, OriginModelName=HDR2.54-1P, SymbolName="Header 2", UniqueId=7db8ea879d3067b5, 版权归属="封装库来自淘宝 ID：黄晶宝石", 联系售后=https://shop463601444.taobao.com
  JP5: AddInBom=yes, DesignItemID="Header 2", Device="Header 2", FootprintName=HDR2.54-LI-2P, LibraryName="5.4 - 接插件-脚距2.54 (100mil)", Origin Footprint=XH2.54-WI-2P, OriginFootprint 2=XH2.54-LI-2P, OriginFootprint 3=HDR2.54-M-LI-2P, OriginFootprint 4=HDR2.54-WI-2P, OriginFootprint 5=HDR2.54-WS-2P, OriginFootprint 6=HDR2.54-Y-LI-2P, OriginFootprint 7=HDR2.54-M-WS-2P, OriginFootprint 8=KF2510-LI-2P, OriginFootprint 9=XH2.54-WS-2P, OriginFootprint 10=XH2.54-LS-2P, OriginFootprint 11=KF2EDGK-2.54-LI-2P, OriginFootprint 12=KF2EDGK-2.54-WI-2P, OriginModelName=HDR2.54-1P, SymbolName="Header 2", UniqueId=fa82831371ccd6d5, 版权归属="封装库来自淘宝 ID：黄晶宝石", 联系售后=https://shop463601444.taobao.com
  JP6: AddInBom=yes, DesignItemID="Header 2", Device="Header 2", FootprintName=HDR2.54-LI-2P, LibraryName="5.4 - 接插件-脚距2.54 (100mil)", Origin Footprint=XH2.54-WI-2P, OriginFootprint 2=XH2.54-LI-2P, OriginFootprint 3=HDR2.54-M-LI-2P, OriginFootprint 4=HDR2.54-WI-2P, OriginFootprint 5=HDR2.54-WS-2P, OriginFootprint 6=HDR2.54-Y-LI-2P, OriginFootprint 7=HDR2.54-M-WS-2P, OriginFootprint 8=KF2510-LI-2P, OriginFootprint 9=XH2.54-WS-2P, OriginFootprint 10=XH2.54-LS-2P, OriginFootprint 11=KF2EDGK-2.54-LI-2P, OriginFootprint 12=KF2EDGK-2.54-WI-2P, OriginModelName=HDR2.54-1P, SymbolName="Header 2", UniqueId=6910556eac3a76a2, 版权归属="封装库来自淘宝 ID：黄晶宝石", 联系售后=https://shop463601444.taobao.com
  JP7: AddInBom=yes, DesignItemID="Header 2", Device="Header 2", FootprintName=HDR2.54-LI-2P, LibraryName="5.4 - 接插件-脚距2.54 (100mil)", Origin Footprint=XH2.54-WI-2P, OriginFootprint 2=XH2.54-LI-2P, OriginFootprint 3=HDR2.54-M-LI-2P, OriginFootprint 4=HDR2.54-WI-2P, OriginFootprint 5=HDR2.54-WS-2P, OriginFootprint 6=HDR2.54-Y-LI-2P, OriginFootprint 7=HDR2.54-M-WS-2P, OriginFootprint 8=KF2510-LI-2P, OriginFootprint 9=XH2.54-WS-2P, OriginFootprint 10=XH2.54-LS-2P, OriginFootprint 11=KF2EDGK-2.54-LI-2P, OriginFootprint 12=KF2EDGK-2.54-WI-2P, OriginModelName=HDR2.54-1P, SymbolName="Header 2", UniqueId=1e4a53fbbd604e66, 版权归属="封装库来自淘宝 ID：黄晶宝石", 联系售后=https://shop463601444.taobao.com
  JP8: AddInBom=yes, DesignItemID="Header 2", Device="Header 2", FootprintName=HDR2.54-LI-2P, LibraryName="5.4 - 接插件-脚距2.54 (100mil)", Origin Footprint=XH2.54-WI-2P, OriginFootprint 2=XH2.54-LI-2P, OriginFootprint 3=HDR2.54-M-LI-2P, OriginFootprint 4=HDR2.54-WI-2P, OriginFootprint 5=HDR2.54-WS-2P, OriginFootprint 6=HDR2.54-Y-LI-2P, OriginFootprint 7=HDR2.54-M-WS-2P, OriginFootprint 8=KF2510-LI-2P, OriginFootprint 9=XH2.54-WS-2P, OriginFootprint 10=XH2.54-LS-2P, OriginFootprint 11=KF2EDGK-2.54-LI-2P, OriginFootprint 12=KF2EDGK-2.54-WI-2P, OriginModelName=HDR2.54-1P, SymbolName="Header 2", UniqueId=6655918135225170, 版权归属="封装库来自淘宝 ID：黄晶宝石", 联系售后=https://shop463601444.taobao.com
  JP9: AddInBom=yes, DesignItemID="Header 2", Device="Header 2", FootprintName=HDR2.54-LI-2P, LibraryName="5.4 - 接插件-脚距2.54 (100mil)", Origin Footprint=XH2.54-WI-2P, OriginFootprint 2=XH2.54-LI-2P, OriginFootprint 3=HDR2.54-M-LI-2P, OriginFootprint 4=HDR2.54-WI-2P, OriginFootprint 5=HDR2.54-WS-2P, OriginFootprint 6=HDR2.54-Y-LI-2P, OriginFootprint 7=HDR2.54-M-WS-2P, OriginFootprint 8=KF2510-LI-2P, OriginFootprint 9=XH2.54-WS-2P, OriginFootprint 10=XH2.54-LS-2P, OriginFootprint 11=KF2EDGK-2.54-LI-2P, OriginFootprint 12=KF2EDGK-2.54-WI-2P, OriginModelName=HDR2.54-1P, SymbolName="Header 2", UniqueId=4577e3d3da87c365, 版权归属="封装库来自淘宝 ID：黄晶宝石", 联系售后=https://shop463601444.taobao.com
  JP10: AddInBom=yes, DesignItemID="Header 2", Device="Header 2", FootprintName=HDR2.54-LI-2P, LibraryName="5.4 - 接插件-脚距2.54 (100mil)", Origin Footprint=XH2.54-WI-2P, OriginFootprint 2=XH2.54-LI-2P, OriginFootprint 3=HDR2.54-M-LI-2P, OriginFootprint 4=HDR2.54-WI-2P, OriginFootprint 5=HDR2.54-WS-2P, OriginFootprint 6=HDR2.54-Y-LI-2P, OriginFootprint 7=HDR2.54-M-WS-2P, OriginFootprint 8=KF2510-LI-2P, OriginFootprint 9=XH2.54-WS-2P, OriginFootprint 10=XH2.54-LS-2P, OriginFootprint 11=KF2EDGK-2.54-LI-2P, OriginFootprint 12=KF2EDGK-2.54-WI-2P, OriginModelName=HDR2.54-1P, SymbolName="Header 2", UniqueId=85e96206a86bca40, 版权归属="封装库来自淘宝 ID：黄晶宝石", 联系售后=https://shop463601444.taobao.com
  JP11: AddInBom=yes, DesignItemID="Header 2", Device="Header 2", FootprintName=HDR2.54-LI-2P, LibraryName="5.4 - 接插件-脚距2.54 (100mil)", Origin Footprint=XH2.54-WI-2P, OriginFootprint 2=XH2.54-LI-2P, OriginFootprint 3=HDR2.54-M-LI-2P, OriginFootprint 4=HDR2.54-WI-2P, OriginFootprint 5=HDR2.54-WS-2P, OriginFootprint 6=HDR2.54-Y-LI-2P, OriginFootprint 7=HDR2.54-M-WS-2P, OriginFootprint 8=KF2510-LI-2P, OriginFootprint 9=XH2.54-WS-2P, OriginFootprint 10=XH2.54-LS-2P, OriginFootprint 11=KF2EDGK-2.54-LI-2P, OriginFootprint 12=KF2EDGK-2.54-WI-2P, OriginModelName=HDR2.54-1P, SymbolName="Header 2", UniqueId=ddeec7be49001c93, 版权归属="封装库来自淘宝 ID：黄晶宝石", 联系售后=https://shop463601444.taobao.com
  JP12: AddInBom=yes, DesignItemID="Header 2", Device="Header 2", FootprintName=HDR2.54-LI-2P, LibraryName="5.4 - 接插件-脚距2.54 (100mil)", Origin Footprint=XH2.54-WI-2P, OriginFootprint 2=XH2.54-LI-2P, OriginFootprint 3=HDR2.54-M-LI-2P, OriginFootprint 4=HDR2.54-WI-2P, OriginFootprint 5=HDR2.54-WS-2P, OriginFootprint 6=HDR2.54-Y-LI-2P, OriginFootprint 7=HDR2.54-M-WS-2P, OriginFootprint 8=KF2510-LI-2P, OriginFootprint 9=XH2.54-WS-2P, OriginFootprint 10=XH2.54-LS-2P, OriginFootprint 11=KF2EDGK-2.54-LI-2P, OriginFootprint 12=KF2EDGK-2.54-WI-2P, OriginModelName=HDR2.54-1P, SymbolName="Header 2", UniqueId=6d8656e8ed237838, 版权归属="封装库来自淘宝 ID：黄晶宝石", 联系售后=https://shop463601444.taobao.com
  JP13: AddInBom=yes, DesignItemID="Header 2", Device="Header 2", FootprintName=HDR2.54-LI-2P, LibraryName="5.4 - 接插件-脚距2.54 (100mil)", Origin Footprint=XH2.54-WI-2P, OriginFootprint 2=XH2.54-LI-2P, OriginFootprint 3=HDR2.54-M-LI-2P, OriginFootprint 4=HDR2.54-WI-2P, OriginFootprint 5=HDR2.54-WS-2P, OriginFootprint 6=HDR2.54-Y-LI-2P, OriginFootprint 7=HDR2.54-M-WS-2P, OriginFootprint 8=KF2510-LI-2P, OriginFootprint 9=XH2.54-WS-2P, OriginFootprint 10=XH2.54-LS-2P, OriginFootprint 11=KF2EDGK-2.54-LI-2P, OriginFootprint 12=KF2EDGK-2.54-WI-2P, OriginModelName=HDR2.54-1P, SymbolName="Header 2", UniqueId=fcba59359dd8e679, 版权归属="封装库来自淘宝 ID：黄晶宝石", 联系售后=https://shop463601444.taobao.com
  JP14: AddInBom=yes, DesignItemID="Header 2", Device="Header 2", FootprintName=HDR2.54-LI-2P, LibraryName="5.4 - 接插件-脚距2.54 (100mil)", Origin Footprint=XH2.54-WI-2P, OriginFootprint 2=XH2.54-LI-2P, OriginFootprint 3=HDR2.54-M-LI-2P, OriginFootprint 4=HDR2.54-WI-2P, OriginFootprint 5=HDR2.54-WS-2P, OriginFootprint 6=HDR2.54-Y-LI-2P, OriginFootprint 7=HDR2.54-M-WS-2P, OriginFootprint 8=KF2510-LI-2P, OriginFootprint 9=XH2.54-WS-2P, OriginFootprint 10=XH2.54-LS-2P, OriginFootprint 11=KF2EDGK-2.54-LI-2P, OriginFootprint 12=KF2EDGK-2.54-WI-2P, OriginModelName=HDR2.54-1P, SymbolName="Header 2", UniqueId=2c2198ed19c983b6, 版权归属="封装库来自淘宝 ID：黄晶宝石", 联系售后=https://shop463601444.taobao.com
  JP15: AddInBom=yes, DesignItemID="Header 2", Device="Header 2", FootprintName=HDR2.54-LI-2P, LibraryName="5.4 - 接插件-脚距2.54 (100mil)", Origin Footprint=XH2.54-WI-2P, OriginFootprint 2=XH2.54-LI-2P, OriginFootprint 3=HDR2.54-M-LI-2P, OriginFootprint 4=HDR2.54-WI-2P, OriginFootprint 5=HDR2.54-WS-2P, OriginFootprint 6=HDR2.54-Y-LI-2P, OriginFootprint 7=HDR2.54-M-WS-2P, OriginFootprint 8=KF2510-LI-2P, OriginFootprint 9=XH2.54-WS-2P, OriginFootprint 10=XH2.54-LS-2P, OriginFootprint 11=KF2EDGK-2.54-LI-2P, OriginFootprint 12=KF2EDGK-2.54-WI-2P, OriginModelName=HDR2.54-1P, SymbolName="Header 2", UniqueId=2a3f0cfc6900396e, 版权归属="封装库来自淘宝 ID：黄晶宝石", 联系售后=https://shop463601444.taobao.com